# Altium PCB PCB1.PcbDoc (part 1 of 2)
Units mil, origin at the board's own origin, x right, y up, seen from the top; angles counter-clockwise.
Board outline 6000 x 4000 mil, 2 copper layers (Top Layer, Bottom Layer); 89 components, 126 nets, 437 pads, 0 vias.
Unrouted connection lines stored in the file: 287.
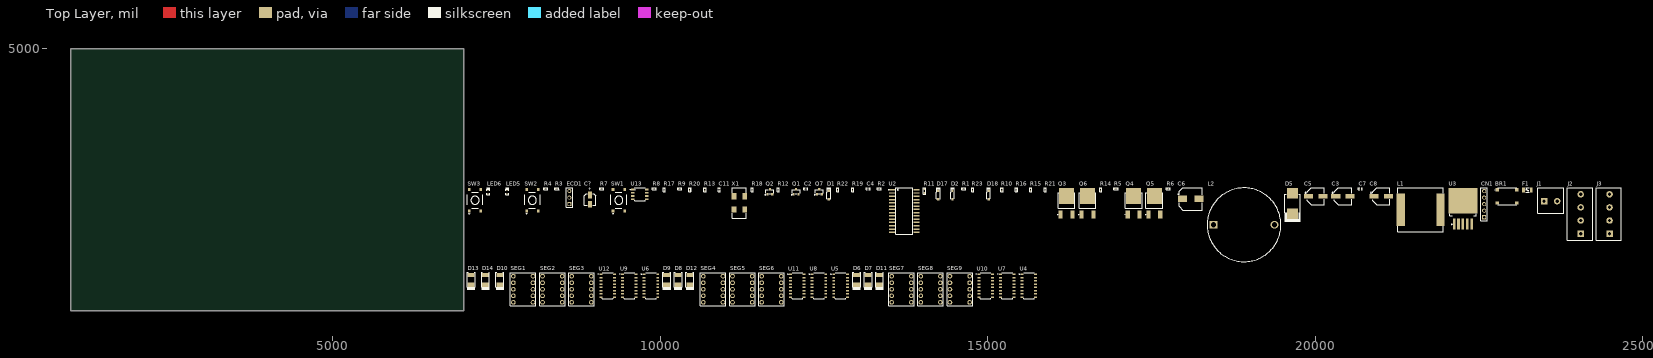
[diagram p0: Top Layer view]
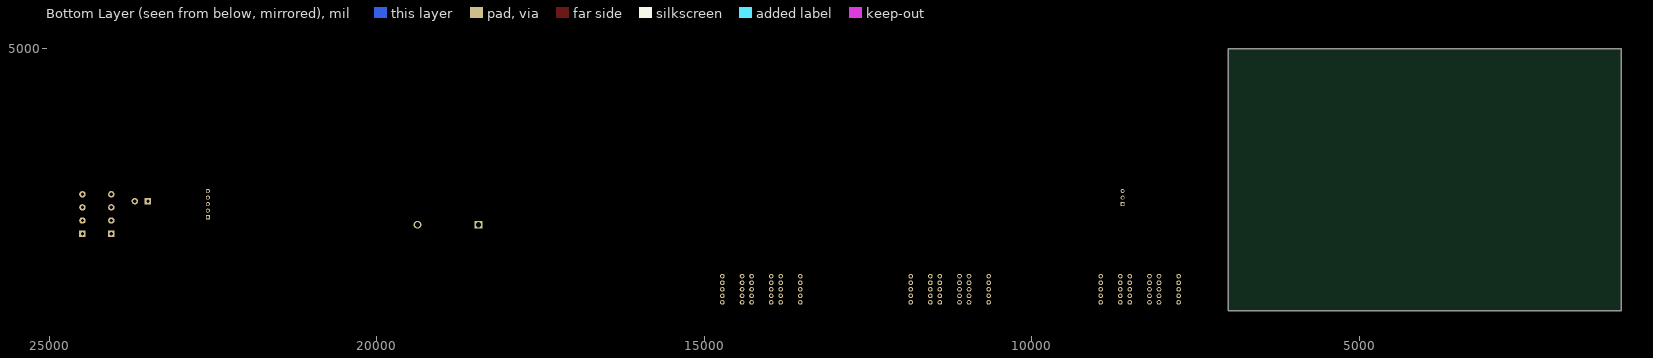
[diagram p1: Bottom Layer view, seen from below]

## Layer stack, top to bottom
Top Solder: solder mask 0.4, Solder Resist, Dk 3.5
Top Layer: signal copper 1.4
Dielectric 1: dielectric 12.6, FR-4, Dk 4.8
Bottom Layer: signal copper 1.4
Bottom Solder: solder mask 0.4, Solder Resist, Dk 3.5

## Board outline
1000,1000 7000,1000 7000,5000 1000,5000

## Design rules (kind name [scope] priority, off if disabled: settings)
Clearance [All] p1: gap=10 ignorepadtopadclearanceinfootprint=FALSE except(0: Arc-Hole Track-Hole SMDPad-Hole THPad-Hole Via-Hole Fill-Hole Poly-Hole Region-Hole Text-Hole)
PolygonConnect [All] p1: connectstyle=Relief reliefconductorwidth=10 reliefentries=4 polygonreliefangle="90 Angle" airgapwidth=10
RoutingVias [All] p1: holewidth=28 width=50 viastyle="Through Hole" minholewidth=28 minwidth=50 maxholewidth=28 maxwidth=50
SolderMaskExpansion [All] p1: expansion=4 istentingtop=FALSE
Width [All] p1: maxlimit=10 minlimit=10 preferedwidth=10
30 further rules are at their usual default settings.

## Classes and differential pairs
component class Controller-Sheet: BR1 C2 C3 C4 C5 C6 C7 C8 C11 C? CN1 D1 D2 D5 D17 D18 ECD1 F1 J1 J2 J3 L1 L2 LED5 LED6 Q1 Q2 Q3 Q4 Q5 Q6 Q7 R1 R2 R3 R4 R5 R6 R7 R8 R9 R10 R11 R12 R13 R14 R15 R16 R17 R18 R19 R20 R21 R22 R23 SW1 SW2 SW3 U2 U3 U13 X1
component class 7-Segment-Sheet: D6 D7 D8 D9 D10 D11 D12 D13 D14 SEG1 SEG2 SEG3 SEG4 SEG5 SEG6 SEG7 SEG8 SEG9 U4 U5 U6 U7 U8 U9 U10 U11 U12

## Components (designator, comment, footprint, x,y, rotation, side; value= is the part's Value field where it differs from the comment)
BR1 "MRS30M" MSBL 22930,2745 r0 top
C2 "0.1uF" Cap-0402 12225,2860 r0 top
C3 "100uF" RVT1H101M0607 20425,2745 r0 top
C4 "0.1uF" Cap-0402 13175,2860 r0 top
C5 "100uF" RVT1H101M0607 20010,2745 r0 top
C6 "100uF" UWT1H101MNL1GS_ 18100,2705 r0 top
C7 "0.1uF" Cap-0402 20690,2860 r0 top
C8 "100uF" RVT1H101M0607 21010,2745 r0 top
C11 "0.1uF" Cap-0402 10905,2845 r90 top
C? "865060640001" WCAP-ASLL_D4H5.5 -41070,52695 r90 top
CN1 "B-2100S05P-A110" HDR1X5_ 22580,2425 r90 top
D1 "BAT43W-TP" SOD-123 12575,2765 r90 top
D2 "BAT43W-TP" SOD-123 14465,2765 r90 top
D5 "B560C-13-F" SMC 19655,2635 r90 top
D6 "1N4007- SMD" SMA(DO-214AC) 13000,1470 r90 top
D7 "1N4007- SMD" SMA(DO-214AC) 13175,1470 r90 top
D8 "1N4007- SMD" SMA(DO-214AC) 10275,1470 r90 top
D9 "1N4007- SMD" SMA(DO-214AC) 10100,1470 r90 top
D10 "1N4007- SMD" SMA(DO-214AC) 7555,1470 r90 top
D11 "1N4007- SMD" SMA(DO-214AC) 13350,1470 r90 top
D12 "1N4007- SMD" SMA(DO-214AC) 10455,1470 r90 top
D13 "1N4007- SMD" SMA(DO-214AC) 7115,1470 r90 top
D14 "1N4007- SMD" SMA(DO-214AC) 7335,1470 r90 top
D17 "BAT43W-TP" SOD-123 14245,2765 r90 top
D18 "BAT43W-TP" SOD-123 15015,2765 r90 top
ECD1 "B-2100S03P-A110" HDR1X3_ 8615,2625 r90 top
F1 "0458005.DR" "Fuse 1206 (3216 Metric)" 23240,2840 r0 top
J1 "1715721" 1715721 23595,2670 r0 top
J2 "1715747" 1715747 24055,2475 r90 top
J3 "1715747" 1715747 24495,2475 r90 top
L1 "100uH" SRP1770TA-101M 21610,2540 r0 top
L2 "1410454C" FP-1410454C-MFG 18915,2310 r0 top
LED5 "RED" LED-0603 7665,2810 r90 top
LED6 "Emerald" LED-0603 7375,2810 r90 top
Q1 "BSS138LT1G" SOT-23 12075,2815 r0 top
Q2 "MMBT3904-TP" SOT-23 11675,2815 r0 top
Q3 "IRFR024NTRPBF" DPAK 16205,2610 r0 top value=75mR
Q4 "IRFR5305TRLPBF" DPAK 17230,2610 r0 top
Q5 "IRFR5305TRLPBF" DPAK 17545,2610 r0 top
Q6 "IRFR024NTRPBF" DPAK 16525,2610 r0 top value=75mR
Q7 "BSS138LT1G" SOT-23 12430,2815 r0 top
R1 "27K" Res-0402 14635,2860 r0 top
R2 "4.7K" Res-0402 13345,2860 r0 top
R3 "1K" Res-0402 8425,2860 r0 top
R4 "1K" Res-0402 8255,2860 r0 top
R5 "12K" Res-0402 16960,2860 r0 top value=12kR
R6 "12K" Res-0402 17760,2860 r0 top value=12kR
R7 "3.3K" Res-0402 9110,2860 r0 top
R8 "33K" Res-0402 9910,2860 r0 top
R9 "3.3K" Res-0402 10300,2860 r0 top
R10 "100K" Res-0402 15220,2845 r90 top
R11 "0.3R" Res-0603 14035,2825 r90 top value=300mR
R12 "12K" Res-0402 11805,2845 r90 top value=12kR
R13 "12K" Res-0402 10685,2845 r90 top value=12kR
R14 "27K" Res-0402 16725,2845 r90 top
R15 "1.5K" Res-0402 15660,2845 r90 top
R16 "100K" Res-0402 15440,2845 r90 top
R17 "1.5K" Res-0402 10065,2845 r90 top
R18 "10K" Res-0402 11405,2845 r90 top
R19 "1.5K" Res-0402 12940,2845 r90 top
R20 "12K" Res-0402 10455,2845 r90 top value=12kR
R21 "1.5K" Res-0402 15880,2845 r90 top
R22 "1.5K" Res-0402 12710,2845 r90 top
R23 "27K" Res-0402 14770,2845 r90 top
SEG1 "SC39-11SURKWA" SC39-11SURKWA 7910,1325 r0 top
SEG2 "SC39-11SURKWA" SC39-11SURKWA 8355,1325 r0 top
SEG3 "SC39-11SURKWA" SC39-11SURKWA 8800,1325 r0 top
SEG4 "SC39-11SURKWA" SC39-11SURKWA 10810,1325 r0 top
SEG5 "SC39-11SURKWA" SC39-11SURKWA 11255,1325 r0 top
SEG6 "SC39-11SURKWA" SC39-11SURKWA 11700,1325 r0 top
SEG7 "SC39-11SURKWA" SC39-11SURKWA 13685,1325 r0 top
SEG8 "SC39-11SURKWA" SC39-11SURKWA 14130,1325 r0 top
SEG9 "SC39-11SURKWA" SC39-11SURKWA 14575,1325 r0 top
SW1 "K2-1102SP-C4SC-04" K2-1102SP-C4SC-04 9370,2685 r90 top
SW2 "K2-1102SP-C4SC-04" K2-1102SP-C4SC-04 8050,2685 r90 top
SW3 "K2-1102SP-C4SC-04" K2-1102SP-C4SC-04 7175,2685 r90 top
U2 "PIC16F873A-I/SO" 28-SOIC 13730,2520 r0 top
U3 "LM2576SX-5.0/NOPB" "TO-263-5 (D2PAK)" 22255,2500 r0 top
U4 "SN74LS595DR" "16-SOIC (0.154\", 3.90mm Width)" 15630,1380 r0 top
U5 "SN74LS595DR" "16-SOIC (0.154\", 3.90mm Width)" 12755,1380 r0 top
U6 "SN74LS595DR" "16-SOIC (0.154\", 3.90mm Width)" 9860,1380 r0 top
U7 "SN74LS595DR" "16-SOIC (0.154\", 3.90mm Width)" 15300,1380 r0 top
U8 "SN74LS595DR" "16-SOIC (0.154\", 3.90mm Width)" 12425,1380 r0 top
U9 "SN74LS595DR" "16-SOIC (0.154\", 3.90mm Width)" 9530,1380 r0 top
U10 "SN74LS595DR" "16-SOIC (0.154\", 3.90mm Width)" 14970,1380 r0 top
U11 "SN74LS595DR" "16-SOIC (0.154\", 3.90mm Width)" 12095,1380 r0 top
U12 "SN74LS595DR" "16-SOIC (0.154\", 3.90mm Width)" 9200,1380 r0 top
U13 "LM358DT" SOP-8 9690,2775 r0 top
X1 "ECS-40-20-18-TR" ECS-40-20-18-TR 11210,2645 r90 top

## Footprints (in the part's own frame and the unit in brackets; to place one, negate y for a bottom-side part, rotate by r counter-clockwise, add the part's x,y. Pads: shape width x height; smd on the part's side, far side on the other; paste and mask are expansions set on the pad)
"16-SOIC (0.154\", 3.90mm Width)" [mm]
  rect 1.12x0.58 smd: 1(-2.64,4.445) 2(-2.64,3.175) 3(-2.64,1.905) 4(-2.64,0.635) 5(-2.64,-0.635) 6(-2.64,-1.905) 7(-2.64,-3.175) 8(-2.64,-4.445) 9(2.64,-4.445) 10(2.64,-3.175) 11(2.64,-1.905) 12(2.64,-0.635) 13(2.64,0.635) 14(2.64,1.905) 15(2.64,3.175) 16(2.64,4.445)
  silkscreen extent -3.74,-5.03 2.06,5.03, body extent -3,-4.95 3,4.95, height 1.75
28-SOIC [mil]
  rect 94.02x22.6 smd paste+0 mask+2: 1(-186.77,325) 2(-186.77,275) 3(-186.77,225) 4(-186.77,175) 5(-186.77,125) 6(-186.77,75) 7(-186.77,25) 8(-186.77,-25) 9(-186.77,-75) 10(-186.77,-125) 11(-186.77,-175) 12(-186.77,-225) 13(-186.77,-275) 14(-186.77,-325) 15(186.77,-325) 16(186.77,-275) 17(186.77,-225) 18(186.77,-175) 19(186.77,-125) 20(186.77,-75) 21(186.77,-25) 22(186.77,25) 23(186.77,75) 24(186.77,125) 25(186.77,175) 26(186.77,225) 27(186.77,275) 28(186.77,325)
  silkscreen extent -243,-355 131,355, body extent -203,-352 203,352, height 104
1715721 [mm]
  rect 2.5x2.5 / inner round 2.5 / far side rect 2.5x2.5 hole 1.3: 1(-2.54,0)
  round 2.5 hole 1.3: 2(2.54,0)
  silkscreen extent -5.08,-4.6 5.08,5.2, body extent -5.64,-4.62 5.09,5.21, height 14.2
1715747 [mm]
  rect 2.5x2.5 / inner round 2.5 / far side rect 2.5x2.5 hole 1.3: 1(-7.62,0)
  round 2.5 hole 1.3: 2(-2.54,0) 3(2.54,0) 4(7.62,0)
  silkscreen extent -10.16,-4.6 10.16,5.2, body extent -10.7,-4.62 10.19,5.21, height 14.2
Cap-0402 [mil]
  rect 18x25 smd mask+2.36: 1(-18.5,0) 2(18.5,0)
  silkscreen extent -31,-16 31,16, body extent -20,-10 20,10, height 19
DPAK [mm]
  rect 1.6x3 smd: 1(-2.285,-3.59) 3(2.285,-3.59)
  rect 5.8x6.2 smd: 2(0,3.59)
  silkscreen extent -3.35,-3.76 3.28,4.88, body extent -3.28,-3.99 3.22,5.92, height 2.51
ECS-40-20-18-TR [mm]
  rect 2.4x1.9 smd: 1(-2.54,-2.1) 1(-2.54,2.1) 2(2.54,-2.1) 2(2.54,2.1)
  silkscreen extent -5.9,-2.75 5.9,2.75
FP-1410454C-MFG [mm]
  rect 3.05x3.05 hole 2 paste-1000 mask+0: 1(-11.8,0)
  round 3.05 hole 2 paste-1000 mask+0: 2(11.8,0)
  silkscreen extent -14.3,-14.3 14.3,14.3, body extent -14.05,-14.05 14.05,14.05, height 0.25
"Fuse 1206 (3216 Metric)" [mm] "0.126\" L x 0.062\" W x 0.026\" H (3.20mm x 1.58mm x 0.65mm)"
  rect 1.06x1.82 smd: 1(-1.528,0) 2(1.528,0)
  silkscreen extent -0.68,-0.85 0.68,0.85, body extent -1.6,-0.79 1.6,0.79, height 0.85
HDR1X3_ [mm] "Connector; Header; 3 Position"
  rect 1.5x1.5 hole 0.9: 1(0,0)
  round 1.5 hole 0.9: 2(2.54,0) 3(5.08,0)
  silkscreen extent -1.27,-1.27 6.35,1.27, body extent -1.27,-1.24 6.35,1.25, height 8.54
HDR1X5_ [mm] "Connector; Header; 5 Position"
  rect 1.6x1.6 hole 0.95: 1(0,0)
  round 1.6 hole 0.95: 2(2.54,0) 3(5.08,0) 4(7.62,0) 5(10.16,0)
  silkscreen extent -1.27,-1.27 11.43,1.27, body extent -1.27,-1.27 11.43,1.23, height 8.65
K2-1102SP-C4SC-04 [mm]
  rect 1.15x1 smd: 1(-4.175,2.25) 2(4.175,2.25) 3(-4.175,-2.25) 4(4.175,-2.25)
  silkscreen extent -5.16,-3.05 3.15,3.05, body extent -4.75,-3 4.75,3, height 5.07
LED-0603 [mm]
  rect 0.5x1 smd: 1(-0.75,0) 2(0.75,0)
  silkscreen extent -1.12,-0.66 1.75,0.66, body extent -0.82,-0.37 0.82,0.36, height 0.68
MSBL [mm]
  rect 1.3x1.2 smd paste+0 mask+0.051: 1(-3.75,2.55) 2(3.75,2.55) 3(-3.75,-2.55) 4(3.75,-2.55)
  silkscreen extent -4.78,-3.35 3.7,3.35
Res-0402 [mil]
  rect 18x25 smd mask+2.17: 1(-18.5,0) 2(18.5,0)
  silkscreen extent -32,-17 32,16, body extent -23,-11 23,11, height 16
Res-0603 [mil]
  rect 30x35 smd: 1(-30,0) 2(30,0)
  silkscreen extent -48,-21 48,21, body extent -31,-17 31,17, height 18
RVT1H101M0607 [mm]
  rect 3.5x1.6 smd: 1(-2.8,0) 2(2.8,0)
  silkscreen extent -4.27,-3.33 3.32,3.33, body extent -3.31,-3.33 3.29,3.27, height 7.94
SC39-11SURKWA [mm]
  round 1.8 hole 1: 1(-3.81,5.08) 2(-3.81,2.54) 3(-3.81,0) 4(-3.81,-2.54) 5(-3.81,-5.08) 6(3.81,-5.08) 7(3.81,-2.54) 8(3.81,0) 9(3.81,2.54) 10(3.81,5.08)
  silkscreen extent -4.95,-6.48 4.95,6.48
SMA(DO-214AC) [mm]
  rect 1.6x2.8 smd: 1(-1.9,0) 2(1.9,0)
  silkscreen extent -3.99,-1.6 2.84,1.6, body extent -2.6,-1.45 2.6,1.45, height 2.3
SMC [mm]
  rect 4.1x4.3 smd: 1(-3.95,0) 2(3.95,0)
  silkscreen extent -7.24,-3.05 3.58,3.05, body extent -3.9,-2.95 3.9,2.95, height 2.41
SOD-123 [mm]
  rect 0.95x0.9 smd: 1(-1.575,0) 2(1.575,0)
  silkscreen extent -1.37,-0.8 2.82,0.8, body extent -1.82,-0.78 1.83,0.78, height 1.5
SOP-8 [mm]
  rect 1.3x0.7 smd: 1(-2.75,1.905) 2(-2.75,0.635) 3(-2.75,-0.635) 4(-2.75,-1.905) 5(2.75,-1.905) 6(2.75,-0.635) 7(2.75,0.635) 8(2.75,1.905)
  silkscreen extent -3.69,-2.57 2.03,2.57, body extent -3.1,-2.5 3.1,2.5, height 1.76
SOT-23 [mm] "TRANS NPN 40V 0.6A SOT23"
  rect 0.82x0.92 smd: 1(-0.95,-1) 2(0.95,-1) 3(0,1)
  silkscreen extent -1.68,-1.3 1.55,0.81, body extent -1.5,-1.25 1.5,1.25, height 1.05
SRP1770TA-101M [mm]
  rect 3.15x12.5 smd paste+0 mask+0.051: 1(-7.7,0) 2(7.7,0)
  silkscreen extent -8.84,-8.51 8.84,8.51, body extent -8.8,-8.45 8.8,8.46, height 6.7
"TO-263-5 (D2PAK)" [mm]
  rect 1.02x4.32 smd: 1(-3.4,-4.573) 2(-1.7,-4.573) 3(0,-4.573) 4(1.7,-4.573) 5(3.4,-4.573)
  rect 11.18x9.91 smd: 6(0,4.573)
  silkscreen extent -5.16,-4.72 5.16,-0.61, body extent -5.11,-5.78 5.05,9.13, height 4.83
UWT1H101MNL1GS_ [mm]
  rect 3.5x2.5 smd: 1(-3.25,0) 2(3.25,0)
  silkscreen extent -5.1,-4.32 4.45,4.32, body extent -4.65,-4.25 4.65,4.25, height 10.34
WCAP-ASLL_D4H5.5 [mm] "Aluminium Electrolytic V-Chip SMT Capacitors, 4x5.5mm"
  rect 2.6x1.6 smd: 1(-1268.2,-1270) 2(-1271.8,-1270)
  silkscreen extent -1272.25,-1272.25 -1267.75,-1267.75, body extent -1272.5,-1272.15 -1267.5,-1267.85, height 5.5

## Part data
BR1: "RAPID GPP RECTIFIER MSB T&R 2.5K", Manufacturer=Diodes, Supplier Part Number=31-MRS30MCT-ND, Item Type="Bridge Rectifiers", Manufacturer Part Number=MRS30M, Pricing="1=0.46, 10=0.357, 100=0.2143, 500=0.19846, 1000=0.13496 (USD)", RoHS=No, Stock=4995, Supplier=Digikey
C2 C4 C7 C11: library part C1005X5R1H104K050BB, "CAP CER 0.1UF 50V X5R 0402", Capacitance=100nF, Case Code (Imperial)=0402, Case Code (Metric)=1005, Dielectric=X5R, Dielectric Material=Ceramic, LCSC Part Number=C2181865, Manufacturer=TDK, Max Operating Temperature=85°C, Min Operating Temperature=-55°C, Package Quantity=1, Supplier Part Number 1=445-5942-1-ND, Tolerance=10%, Voltage=50V, Case/Package=0402, ComponentLink1Description=https://product.tdk.com/info/en/catalog/spec/mlccspec_commercial_general_midvoltage_en.pdf?src-supplier=Digi-Key, ComponentLink1URL=https://product.tdk.com/info/en/catalog/spec/mlccspec_commercial_general_midvoltage_en.pdf?src-supplier=Digi-Key, ComponentLink2Description=http://www.tdk.co.jp/tefe02/e413_c.pdf?src-supplier=Future+Electronics, ComponentLink2URL=http://www.tdk.co.jp/tefe02/e413_c.pdf?src-supplier=Future+Electronics, ComponentLink3Description=https://www.verical.com/server-webapp/html/getDatasheet?partID=743571&src-supplier=Verical, ComponentLink3URL=https://www.verical.com/server-webapp/html/getDatasheet?partID=743571&src-supplier=Verical, ComponentLink4Description=http://www.tdk.co.jp/tefe02/e412_c.pdf?src-supplier=Avnet+Europe, ComponentLink4URL=http://www.tdk.co.jp/tefe02/e412_c.pdf?src-supplier=Avnet+Europe, Construction=Flat, Depth=0.5mm, Height=0.5mm, Item Type=Capacitor, Lead Free="Lead Free", Length=1mm, Manufacturer Part Number=C1005X5R1H104K050BB, Mount="Surface Mount", Packaging="Tape and Reel", Pricing 1="1=0.12, 10=0.09, 50=0.049, 100=0.04, 500=0.02858, 1000=0.02245, 2500=0.02041, 5000=0.01878 (USD)", Radiation Hardening=No, REACH SVHC="No SVHC", Resistor Type=Ceramic, RoHS Compliant=Yes, Series=C, Stock 1=1455182, Supplier 1=Digi-Key, Termination=SMD/SMT, Thickness=0.022inch, Voltage Rating=50V, Voltage Rating (DC)=50V, Weight=2.3E-05oz, Width=0.02inch
C3 C5 C8: library part RVT1H101M0607, "100uF 50V ±20% SMD,D6.3xL7.7mm Aluminum Electrolytic Capacitors - SMD ROHS", LCSC Part Number=C3151829, Manufacturer=ROQANG, Package=SMD,D6.3xL7.7mm, ComponentLink1Description=LCSC, ComponentLink1URL=https://www.lcsc.com/product-detail/Aluminum-Electrolytic-Capacitors-SMD_ROQANG-RVT1H101M0607_C3151829.html, Item Type=Capacitor, Manufacturer Part Number=RVT1H101M0607
C6: library part UWT1H101MNL1GS, "CAP ALUM 100UF 20% 50V SMD", Case/Package=Radial, Dielectric Material=Aluminium, LCSC Part Number=C445063, Leakage Current=3uA, Manufacturer=Nichicon, Max Operating Temperature=105°C, Min Operating Temperature=-55°C, Package Quantity=500, Ripple Current=140mA, Supplier Part Number 1=493-2226-1-ND, Tolerance=20%, Voltage=50V, Capacitance=100uF, ComponentLink1Description=http://www.farnell.com/datasheets/2100058.pdf?src-supplier=Element14, ComponentLink1URL=http://www.farnell.com/datasheets/2100058.pdf?src-supplier=Element14, ComponentLink2Description=http://www.farnell.com/datasheets/2576809.pdf?src-supplier=Element14, ComponentLink2URL=http://www.farnell.com/datasheets/2576809.pdf?src-supplier=Element14, ComponentLink3Description=http://www.nichicon.co.jp/english/products/pdfs/e-ch_ref.pdf?src-supplier=Digi-Key, ComponentLink3URL=http://www.nichicon.co.jp/english/products/pdfs/e-ch_ref.pdf?src-supplier=Digi-Key, ComponentLink4Description=http://www.mouser.com/ds/2/293/e-wt-30307.pdf?src-supplier=Mouser, ComponentLink4URL=http://www.mouser.com/ds/2/293/e-wt-30307.pdf?src-supplier=Mouser, ComponentLink5Description=http://uk.rs-online.com/webdocs/13ec/0900766b813ecfdc.pdf?src-supplier=RSComponents, ComponentLink5URL=http://uk.rs-online.com/webdocs/13ec/0900766b813ecfdc.pdf?src-supplier=RSComponents, ComponentLink6Description=http://www.nichicon.co.jp/english/products/pdfs/e-wt.pdf?src-supplier=Avnet, ComponentLink6URL=http://www.nichicon.co.jp/english/products/pdfs/e-wt.pdf?src-supplier=Avnet, ComponentLink7Description=http://products.nichicon.co.jp/en/pdf/XJA043/e-wt.pdf?src-supplier=Future+Electronics, ComponentLink7URL=http://products.nichicon.co.jp/en/pdf/XJA043/e-wt.pdf?src-supplier=Future+Electronics, ComponentLink8Description=http://www.nichicon.co.jp/english/products/pdfs/e-wt.pdf?src-supplier=Avnet+Europe, ComponentLink8URL=http://www.nichicon.co.jp/english/products/pdfs/e-wt.pdf?src-supplier=Avnet+Europe, Construction=Cylindrical, Diameter=8mm, Dissipation Factor=0.14%, Height=10mm, Height - Seated (Max)=0.413inch, Item Type=Capacitor, Lead Free="Lead Free", Length=10mm, Life (Hours)=1000Hour, Manufacturer Part Number=UWT1H101MNL1GS, Mount="Surface Mount", Number of Pins=2, Packaging="Tape and Reel", Pricing 1="1=0.57, 10=0.405, 50=0.3058, 100=0.2664 (USD)", Radiation Hardening=No, REACH SVHC="No SVHC", Ripple Current (AC)=140mA, RoHS Compliant=Yes, Series=WT, Stock 1=24169, Supplier 1=Digi-Key, Termination=SMD/SMT, Voltage Rating=50V, Voltage Rating (DC)=50V
C?: library part CMP-03913-53914524-1, "865060640001 WCAP-ASLL Aluminum Electrolytic Capacitors", Capacitance=1µF, Case/Package=Radial, Insulation Resistance=16.6667MΩ, Leakage Current=3µA, Max Operating Temperature=105°C, Min Operating Temperature=-55°C, Ripple Current=60mA, Tolerance=20%, Voltage Rating=50V, Diameter=4mm, Height=5.5mm, Height - Seated (Max)=5.5118mm, Impedance=4.4Ω, Length=5.5mm, Life (Hours)=2000hours, Mount="Surface Mount", NexarPartId=53914524, Packaging="Tape & Reel (TR)", Polarity=Polar, REACH SVHC=Unknown, Ripple Current (AC)=60mA, RoHS=Compliant, Voltage Rating (DC)=50V
CN1: "Straight 2.54mm 6mm -40℃~+105℃ 3mm 5 2.54mm Plugin Black Brass 1x5P Plugin,P=2.54mm Pin Headers ROHS", LCSC Part Number=C124379, Manufacturer="Ckmtw(Shenzhen Cankemeng)", Package=Plugin,P=2.54mm, ComponentLink1Description=LCSC, ComponentLink1URL=https://www.lcsc.com/product-detail/Pin-Headers_Ckmtw-Shenzhen-Cankemeng-B-2100S05P-A110_C124379.html, Item Type=Header, Manufacturer Part Number=B-2100S05P-A110
D1 D2 D17 D18: "DIODE SCHOTTKY 30V 200MA SOD123", LCSC Part Number=C914267, Manufacturer="Micro Commercial Co", Package=SOD-123, ComponentLink1Description=LCSC, ComponentLink1URL=https://www.lcsc.com/product-detail/Schottky-Barrier-Diodes-SBD_MCC-Micro-Commercial-Components-BAT43W-TP_C914267.html, Item Type=Diode, Manufacturer Part Number=BAT43W-TP
D5: "DIODE SCHOTTKY 60V 5A SMC", LCSC Part Number=C85100, Manufacturer=Diodes, ComponentLink1Description=https://datasheet.ciiva.com/27052/1538961-27052355.pdf?src-supplier=Jameco, ComponentLink1URL=https://datasheet.ciiva.com/27052/1538961-27052355.pdf?src-supplier=Jameco, ComponentLink2Description=https://datasheet.ciiva.com/16389/ds13012-16389735.pdf?src-supplier=Future+Electronics, ComponentLink2URL=https://datasheet.ciiva.com/16389/ds13012-16389735.pdf?src-supplier=Future+Electronics, ComponentLink3Description=https://datasheet.ciiva.com/15144/getdatasheetpartid-89786-15144652.pdf?src-supplier=Verical, ComponentLink3URL=https://datasheet.ciiva.com/15144/getdatasheetpartid-89786-15144652.pdf?src-supplier=Verical, ComponentLink4Description=https://datasheet.ciiva.com/1177/ds13012-1177532.pdf?src-supplier=Element14, ComponentLink4URL=https://datasheet.ciiva.com/1177/ds13012-1177532.pdf?src-supplier=Element14, ComponentLink5Description=https://datasheet.ciiva.com/914/ds13012-914985.pdf?src-supplier=Digikey, ComponentLink5URL=https://datasheet.ciiva.com/914/ds13012-914985.pdf?src-supplier=Digikey, ComponentLink6Description=https://datasheet.ciiva.com/914/ds13012-914986.pdf?src-supplier=Digikey, ComponentLink6URL=https://datasheet.ciiva.com/914/ds13012-914986.pdf?src-supplier=Digikey, ComponentLink7Description=https://datasheet.ciiva.com/914/ds13012-914987.pdf?src-supplier=Digikey, ComponentLink7URL=https://datasheet.ciiva.com/914/ds13012-914987.pdf?src-supplier=Digikey, Item Type="Rectifier Diodes", Manufacturer Part Number=B560C-13-F, Pricing="3000=0.151, 6000=0.148, 9000=0.146, 12000=0.145, 15000=0.141 (USD)", RoHS=Yes, Stock=846000, Supplier="Future Electronics"
D6 D7 D8 D9 D10 D11 D12 D13 D14: "1A Single 1kV 1.1V@1A SMA(DO-214AC) Diodes - General Purpose ROHS", LCSC Part Number=C727081, Manufacturer=TWGMC, Manufacturer Part Number=1N4007, Package=SMA(DO-214AC), ComponentLink1Description=LCSC, ComponentLink1URL=https://www.lcsc.com/product-detail/Diodes-General-Purpose_TWGMC-1N4007_C727081.html, Item Type=Diode
ECD1: "Straight 2.54mm Black Brass 1x3P Plugin,P=2.54mm Pin Headers ROHS", LCSC Part Number=C124376, Manufacturer=Ckmtw, ComponentLink1Description=LCSC, ComponentLink1URL=https://www.lcsc.com/product-detail/Pin-Headers_Ckmtw-Shenzhen-Cankemeng-B-2100S03P-A110_C124376.html, Item Type=Header, Manufacturer Part Number=B-2100S03P-A110
F1: "FUSE BRD MNT 5A 32VAC 75VDC 1206", LCSC Part Number=C187561, Manufacturer=Littelfuse, Supplier Part Number=1740294, Category=Fuses, ComponentLink1Description=https://datasheet.ciiva.com/1730/337915-1730547.pdf?src-supplier=Newark, ComponentLink1URL=https://datasheet.ciiva.com/1730/337915-1730547.pdf?src-supplier=Newark, ComponentLink2Description=https://datasheet.ciiva.com/7991/337915-7991910.pdf?src-supplier=Element14, ComponentLink2URL=https://datasheet.ciiva.com/7991/337915-7991910.pdf?src-supplier=Element14, ComponentLink3Description=https://datasheet.ciiva.com/299/littelfuse-fuse-458-series-299786.pdf?src-supplier=Digikey, ComponentLink3URL=https://datasheet.ciiva.com/299/littelfuse-fuse-458-series-299786.pdf?src-supplier=Digikey, ComponentLink4Description=https://datasheet.ciiva.com/299/littelfuse-fuse-458-series-299787.pdf?src-supplier=Digikey, ComponentLink4URL=https://datasheet.ciiva.com/299/littelfuse-fuse-458-series-299787.pdf?src-supplier=Digikey, ComponentLink5Description=https://datasheet.ciiva.com/299/littelfuse-fuse-458-series-299788.pdf?src-supplier=Digikey, ComponentLink5URL=https://datasheet.ciiva.com/299/littelfuse-fuse-458-series-299788.pdf?src-supplier=Digikey, Item Type=Fuse, Manufacturer Part Number=0458005.DR, Pricing="1=0.6241, 10=0.73892, 25=0.71895, 50=0.70003 (GBP)", RoHS=Yes, Stock=1005, Supplier=Rs
J1: "TERM BLK 2P SIDE ENT 5.08MM PCB", Manufacturer="Phoenix Contact", Supplier Part Number=277-1263-ND, ComponentLink1Description=https://datasheet.ciiva.com/1120/1697161-1120393.pdf?src-supplier=Farnell, ComponentLink1URL=https://datasheet.ciiva.com/1120/1697161-1120393.pdf?src-supplier=Farnell, ComponentLink2Description=https://datasheet.ciiva.com/832/1715721-832095.pdf?src-supplier=Digikey, ComponentLink2URL=https://datasheet.ciiva.com/832/1715721-832095.pdf?src-supplier=Digikey, ComponentLink3Description=https://datasheet.ciiva.com/15169/getdatasheetpartid-212174-15169929.pdf?src-supplier=Verical, ComponentLink3URL=https://datasheet.ciiva.com/15169/getdatasheetpartid-212174-15169929.pdf?src-supplier=Verical, ComponentLink4Description=https://datasheet.ciiva.com/16046/1715721-16046034.pdf?src-supplier=Onlinecomponents.com, ComponentLink4URL=https://datasheet.ciiva.com/16046/1715721-16046034.pdf?src-supplier=Onlinecomponents.com, Item Type="Terminal Blocks", Manufacturer Part Number=1715721, Pricing="1=0.94 (USD)", RoHS=Yes, Stock=13160, Supplier=Digikey
J2 J3: "TERM BLK 4P SIDE ENT 5.08MM PCB", Manufacturer="Phoenix Contact", Supplier Part Number=277-1265-ND, ComponentLink1Description=https://datasheet.ciiva.com/16071/1715747-16071928.pdf?src-supplier=Onlinecomponents.com, ComponentLink1URL=https://datasheet.ciiva.com/16071/1715747-16071928.pdf?src-supplier=Onlinecomponents.com, ComponentLink2Description=https://datasheet.ciiva.com/23596/100425-23596240.pdf?src-supplier=Newark, ComponentLink2URL=https://datasheet.ciiva.com/23596/100425-23596240.pdf?src-supplier=Newark, ComponentLink3Description=https://datasheet.ciiva.com/15169/getdatasheetpartid-227081-15169962.pdf?src-supplier=Verical, ComponentLink3URL=https://datasheet.ciiva.com/15169/getdatasheetpartid-227081-15169962.pdf?src-supplier=Verical, ComponentLink4Description=https://datasheet.ciiva.com/11757/0900766b811d7317-11757713.pdf?src-supplier=Rs, ComponentLink4URL=https://datasheet.ciiva.com/11757/0900766b811d7317-11757713.pdf?src-supplier=Rs, ComponentLink5Description=https://datasheet.ciiva.com/824/1715747-824336.pdf?src-supplier=Digikey, ComponentLink5URL=https://datasheet.ciiva.com/824/1715747-824336.pdf?src-supplier=Digikey, ComponentLink6Description=https://datasheet.ciiva.com/1120/1731555-1120440.pdf?src-supplier=Farnell, ComponentLink6URL=https://datasheet.ciiva.com/1120/1731555-1120440.pdf?src-supplier=Farnell, ComponentLink7Description=https://datasheet.ciiva.com/1118/1731555-1118428.pdf?src-supplier=Element14, ComponentLink7URL=https://datasheet.ciiva.com/1118/1731555-1118428.pdf?src-supplier=Element14, ComponentLink8Description=https://datasheet.ciiva.com/33106/1715747-33106010.pdf?src-supplier=Today+Components, ComponentLink8URL=https://datasheet.ciiva.com/33106/1715747-33106010.pdf?src-supplier=Today+Components, ComponentLink9Description=https://datasheet.ciiva.com/29218/743477-da-01-en-printklemmenblock-mkds-1-5-4-5-08-29218070.pdf?src-supplier=Conrad, ComponentLink9URL=https://datasheet.ciiva.com/29218/743477-da-01-en-printklemmenblock-mkds-1-5-4-5-08-29218070.pdf?src-supplier=Conrad, Item Type="Terminal Blocks", Manufacturer Part Number=1715747, Pricing="1=2.39, 10=2.287, 50=2.188, 100=2.1282, 250=1.989, 500=1.82988, 1000=1.79562 (USD)", RoHS=Yes, Stock=3401, Supplier=Digikey
L1: library part SRP1770TA-101M, "FIXED IND 100UH 5.3A 118MOHM SMD", LCSC Part Number=-, Manufacturer="Bourns Inc.", Package=Custom, ComponentLink1Description=LCSC, Item Type=Inductor, Manufacturer Part Number=SRP1770TA-101M
L2: library part CMP-20514-000002-1, "FIXED IND 100UH 5.4A 46 MOHM TH", Case/Package=Radial, Current Rating=5.4A, DC Resistance (DCR)=46mR, Inductance=100uH, Inductance Tolerance=10%, Max Operating Temperature=85°C, Min Operating Temperature=-40°C, Package Quantity=25, Resistor Type=Wirewound, Self Resonant Frequency=4.6MHz, Test Frequency=100kHz, DC Current=5.4A, Depth=25.9mm, Height=1.5mm, Height - Seated (Max)=0.61inch, Lead Free="Lead Free", Lead Length=10mm, Lead Pitch=23.6mm, Lead/Base Style=Radial, Length=14mm, Max DC Current=5.4A, Military Standard=Not, Mount="Through Hole", Number of Pins=2, Orientation=Vertical, Packaging=Tray, Q Factor=24, Radiation Hardening=No, Rated Current-Max=5.4A, REACH SVHC="No SVHC", RMS Current (Irms)=5.4A, RoHS Compliant=Yes, Saturation Current=5.4A, Series=1400, Shielding=Unshielded, Termination=Radial, Tolerance=10%, Type="General Purpose"
LED5: library part NCD0603R3, "RED LED 0603 Light Emitting Diodes", LCSC Part Number=C3151730, Manufacturer="Foshan NationStar Optoelectronics", Package=0603, ComponentLink1Description=LCSC, ComponentLink1URL=https://www.lcsc.com/product-detail/Light-Emitting-Diodes-LED_Foshan-NationStar-Optoelectronics-NCD0603R3_C3151730.html, Item Type=LED, Manufacturer Part Number=NCD0603R3
LED6: library part NCD0603G2, "Emerald 0603 Light Emitting Diodes (LED) ROHS", LCSC Part Number=C87326, Manufacturer="Foshan NationStar Optoelectronics", Package=0603, ComponentLink1Description=LCSC, ComponentLink1URL=https://www.lcsc.com/product-detail/Light-Emitting-Diodes-LED_Foshan-NationStar-Optoelectronics-NCD0603G2_C87326.html, Item Type=LED, Manufacturer Part Number=NCD0603G2
Q1 Q7: "MOSFET N-CH 50V 200MA SOT-23", Case/Package=SOT-23-3, Continuous Drain Current (ID)=200mA, Drain to Source Breakdown Voltage=50V, Drain to Source Resistance=3.5R, Gate to Source Voltage (Vgs)=20V, Input Capacitance=50pF, LCSC Part Number=C82045, Manufacturer="ON Semiconductor", Max Operating Temperature=150°C, Max Power Dissipation=225mW, Min Operating Temperature=-55°C, Package Quantity=1, Supplier Part Number 1=BSS138LT1GOSDKR-ND, Threshold Voltage=1.5V, ComponentLink1Description=https://datasheet.ciiva.com/22641/1596366-22641636.pdf, ComponentLink1URL=https://datasheet.ciiva.com/22641/1596366-22641636.pdf, ComponentLink2Description=https://datasheet.ciiva.com/1190/1596366-1190137.pdf, ComponentLink2URL=https://datasheet.ciiva.com/1190/1596366-1190137.pdf, ComponentLink3Description=https://datasheet.ciiva.com/15198/getdatasheetpartid-110266-15198908.pdf, ComponentLink3URL=https://datasheet.ciiva.com/15198/getdatasheetpartid-110266-15198908.pdf, ComponentLink4Description=https://datasheet.ciiva.com/8115/bss138lt1-d-8115295.pdf, ComponentLink4URL=https://datasheet.ciiva.com/8115/bss138lt1-d-8115295.pdf, ComponentLink5Description=https://datasheet.ciiva.com/8115/bss138lt1-d-8115358.pdf, ComponentLink5URL=https://datasheet.ciiva.com/8115/bss138lt1-d-8115358.pdf, ComponentLink6Description=https://datasheet.ciiva.com/1190/1596366-1190136.pdf, ComponentLink6URL=https://datasheet.ciiva.com/1190/1596366-1190136.pdf, ComponentLink7Description=https://datasheet.ciiva.com/936/bss138lt1-d-936802.pdf, ComponentLink7URL=https://datasheet.ciiva.com/936/bss138lt1-d-936802.pdf, ComponentLink8Description=https://datasheet.ciiva.com/936/bss138lt1-d-936801.pdf, ComponentLink8URL=https://datasheet.ciiva.com/936/bss138lt1-d-936801.pdf, ComponentLink9Description=https://datasheet.ciiva.com/14553/70099493-14553829.pdf, ComponentLink9URL=https://datasheet.ciiva.com/14553/70099493-14553829.pdf, ComponentLink10Description=https://datasheet.ciiva.com/936/bss138lt1-d-936803.pdf, ComponentLink10URL=https://datasheet.ciiva.com/936/bss138lt1-d-936803.pdf, ComponentLink11Description=http://www.onsemi.com/pub/Collateral/BSS138LT1-D.PDF?src-supplier=Digi-Key, ComponentLink11URL=http://www.onsemi.com/pub/Collateral/BSS138LT1-D.PDF?src-supplier=Digi-Key, ComponentLink12Description=http://www.farnell.com/datasheets/1596366.pdf?src-supplier=Element14, ComponentLink12URL=http://www.farnell.com/datasheets/1596366.pdf?src-supplier=Element14, ComponentLink13Description=http://www.alliedelec.com/m/d/b3c6fd7d92596813fe75d33dcbaaae90.pdf?src-supplier=Allied+Electronics, ComponentLink13URL=http://www.alliedelec.com/m/d/b3c6fd7d92596813fe75d33dcbaaae90.pdf?src-supplier=Allied+Electronics, ComponentLink14Description=https://www.verical.com/server-webapp/html/getDatasheet?partID=110266&src-supplier=Verical, ComponentLink14URL=https://www.verical.com/server-webapp/html/getDatasheet?partID=110266&src-supplier=Verical, ComponentLink15Description=http://www.onsemi.com/pub_link/Collateral/BSS138LT1-D.PDF?src-supplier=Avnet, ComponentLink15URL=http://www.onsemi.com/pub_link/Collateral/BSS138LT1-D.PDF?src-supplier=Avnet, Contact Plating=Tin,Matte, Current Rating=200mA, Element Configuration=Single, Halogen Free="Halogen Free", Height=1.01mm, Item Type=Mosfet, Lead Free="Lead Free", Length=3.04mm, Manufacturer Part Number=BSS138LT1G, Nominal Vgs=1.5V, Number of Elements=1, Number of Pins=3, On-State Resistance=3.5R, Packaging="Tape and Reel", Power Dissipation=225mW, Pricing 1="1=0.27, 10=0.222, 100=0.1177, 500=0.07746, 1000=0.05267 (USD)", Radiation Hardening=No, Rds On Max=3.5R, REACH SVHC="No SVHC", Stock 1=1283212, Supplier 1=Digi-Key, Turn-Off Delay Time=20ns, Turn-On Delay Time=20ns, Voltage Rating (DC)=50V, Width=1.4mm
Q2: "TRANS NPN 40V 0.2A SOT23", Case/Package=SOT-23, Clock Frequency=300MHz, Collector Base Voltage (VCBO)=60V, Collector Emitter Breakdown Voltage=40V, Collector Emitter Saturation Voltage=300mV, Current Rating=100mA, Emitter Base Voltage (VEBO)=6V, Manufacturer=MCC, Max Collector Current=200mA, Max Operating Temperature=150°C, Max Power Dissipation=350mW, Min Operating Temperature=-55°C, Package Quantity=1, Supplier Part Number=MMBT3904TPMSCT-ND, Collector Emitter Voltage (VCEO)=40V, Collector-emitter Voltage-Max=300mV, ComponentLink1Description=https://datasheet.ciiva.com/16291/mmbt3904sot-23-37005-16291911.pdf?src-supplier=Mouser, ComponentLink1URL=https://datasheet.ciiva.com/16291/mmbt3904sot-23-37005-16291911.pdf?src-supplier=Mouser, ComponentLink2Description=https://datasheet.ciiva.com/15139/getdatasheetpartid-251950-15139820.pdf?src-supplier=Verical, ComponentLink2URL=https://datasheet.ciiva.com/15139/getdatasheetpartid-251950-15139820.pdf?src-supplier=Verical, ComponentLink3Description=https://datasheet.ciiva.com/972/mmbt3904sot-23-972515.pdf?src-supplier=Digikey, ComponentLink3URL=https://datasheet.ciiva.com/972/mmbt3904sot-23-972515.pdf?src-supplier=Digikey, ComponentLink4Description=https://datasheet.ciiva.com/14546/70055699-14546053.pdf?src-supplier=Allied+Electronics, ComponentLink4URL=https://datasheet.ciiva.com/14546/70055699-14546053.pdf?src-supplier=Allied+Electronics, ComponentLink5Description=https://datasheet.ciiva.com/16742/mmbt3904tsot-523-16742101.pdf?src-supplier=Future+Electronics, ComponentLink5URL=https://datasheet.ciiva.com/16742/mmbt3904tsot-523-16742101.pdf?src-supplier=Future+Electronics, ComponentLink6Description=https://datasheet.ciiva.com/972/mmbt3904sot-23-972516.pdf?src-supplier=Digikey, ComponentLink6URL=https://datasheet.ciiva.com/972/mmbt3904sot-23-972516.pdf?src-supplier=Digikey, Frequency=300MHz, Gain Bandwidth Product=300MHz, Height=1.12mm, hFE Min=40, Item Type=BJTs, Lead Free=5697LeadFree, Length=3.04mm, Manufacturer Part Number=MMBT3904-TP, Max Breakdown Voltage=40V, Mounting Technology="Surface Mount", Number of Elements=1, Packaging="Tape and Reel", Pins=3, Polarity=NPN, Power Dissipation=350mW, Pricing="1=0.1, 10=0.068, 100=0.0369, 500=0.02898, 1000=0.02012 (USD)", Radiation Hardening=No, RoHS=Yes, RoHS Compliant=Yes, Series=-, Stock=2179653, Supplier=Digikey, Transition Frequency=300MHz, Voltage Rating (DC)=40V, Width=1.4mm
Q3 Q6: "MOSFET N-CH 55V 17A DPAK", Current Rating=17A, Manufacturer=Infineon, On-State Resistance=75mR, Package Quantity=2000NUMBER, Supplier Part Number=942-IRFR024NTRPBF, Voltage Rating (DC)=55V, Element Configuration=5460ElementConfiguration, Fall Time=27ns, Item Type=MOSFET, Manufacturer Part Number=IRFR024NTRPBF, Nominal Vgs=4V, Number of Elements=1NUMBER, Pricing="1=0.62, 10=0.541, 50=0.541, 100=0.375, 1000=0.294, 10000=0.293 (USD)", Radiation Hardening=5898YesNo, RoHS=Yes, Stock=51400, Supplier=Mouser
Q4 Q5: "MOSFET P-CH 55V 31A DPAK", Case/Package=TO-252-3, Continuous Drain Current (ID)=31A, Drain to Source Breakdown Voltage=-55V, Drain to Source Resistance=65mR, Gate to Source Voltage (Vgs)=20V, Input Capacitance=1.2nF, Manufacturer=Infineon, Max Operating Temperature=175°C, Max Power Dissipation=110W, Min Operating Temperature=-55°C, Supplier Part Number=942-IRFR5305TRLPBF, Threshold Voltage=-4V, ComponentLink1Description=http://www.farnell.com/datasheets/274342.pdf?src-supplier=Element14, ComponentLink1URL=http://www.farnell.com/datasheets/274342.pdf?src-supplier=Element14, ComponentLink2Description=http://www.farnell.com/datasheets/139980.pdf?src-supplier=Element14, ComponentLink2URL=http://www.farnell.com/datasheets/139980.pdf?src-supplier=Element14, Drain to Source Voltage (Vdss)=-55V, Halogen Free="Halogen Free", Height=0.094inch, Item Type=MOSFET, Lead Free="Contains Lead", Length=0.409inch, Manufacturer Part Number=IRFR5305TRLPBF, Max Dual Supply Voltage=-55V, Mounting Technology="Surface Mount", Packaging="Cut Tape", Pins=3, Polarization=P, Power Dissipation=110W, Pricing="1=1.28, 10=1.04, 50=1.04, 100=0.821, 1000=0.54, 10000=0.49 (USD)", Rds On Max=65mR, Reach SVHC Compliant=No, RoHS=Yes, RoHS Compliant=Yes, Series=HEXFET®, Stock=19036, Supplier=Mouser, Turn-Off Delay Time=39ns, Turn-On Delay Time=14ns, Width=0.265inch
R1 R14 R23: library part RC0402DR-0727KL, "RES 27K OHM 0.5% 1/16W 0402", Case/Package=0402, LCSC Part Number=C138076, Manufacturer=Yageo, Max Operating Temperature=155°C, Max Power Dissipation=63mW, Min Operating Temperature=-55°C, Resistance=27kR, Resistor Type="Thick Film", Supplier Part Number 1=603-RC0402DR-0727KL, Temperature Coefficient=100ppm/°C, Tolerance=0.5%, Category="Chip SMD Resistors", ComponentLink1Description=http://www.yageo.com.tw/exep/pages/download/literatures/PYu-R_INT-thick_7.pdf?src-supplier=Digi-Key, ComponentLink1URL=http://www.yageo.com.tw/exep/pages/download/literatures/PYu-R_INT-thick_7.pdf?src-supplier=Digi-Key, Features="Moisture Resistant", Height=0.016inch, Length=0.039inch, Manufacturer Part Number=RC0402DR-0727KL, Number of Terminations=2, Packaging="Tape and Reel", Pricing 1="1=0.13000, 10=0.07000, 50=0.07000, 100=0.02900, 1000=0.01300, 10000=0.00700 (USD)", RoHS=Yes, RoHS Compliant=Yes, Supplier 1=Mouser, Width=0.02inch
R2: library part RC0402FR-074K7L, "RES 4.7K OHM 1% 1/16W 0402", Case Code (Imperial)=0402, Case Code (Metric)=1005, LCSC Part Number=C105871, Manufacturer=Yageo, Max Operating Temperature=155°C, Max Power Dissipation=63mW, Min Operating Temperature=-55°C, Power Rating=62.5mW, Resistance=4.7kR, Resistance Tolerance=1%, Resistor Type="Thick Film", Temperature Coefficient=100ppm/°C, Voltage Rating=50V, Case/Package=0402, Category="Chip SMD Resistors", ComponentLink1Description=https://datasheet.ciiva.com/22661/1686128-22661342.pdf?src-supplier=Element14, ComponentLink1URL=https://datasheet.ciiva.com/22661/1686128-22661342.pdf?src-supplier=Element14, ComponentLink2Description=https://datasheet.ciiva.com/7850/1018594-7850022.pdf?src-supplier=Element14, ComponentLink2URL=https://datasheet.ciiva.com/7850/1018594-7850022.pdf?src-supplier=Element14, ComponentLink3Description=https://datasheet.ciiva.com/7850/1018594-7850023.pdf?src-supplier=Element14, ComponentLink3URL=https://datasheet.ciiva.com/7850/1018594-7850023.pdf?src-supplier=Element14, ComponentLink4Description=https://datasheet.ciiva.com/15215/getdatasheetpartid-328119-15215035.pdf?src-supplier=Verical, ComponentLink4URL=https://datasheet.ciiva.com/15215/getdatasheetpartid-328119-15215035.pdf?src-supplier=Verical, Construction=Rectangular, Depth=0.5mm, Features="Moisture Resistant", Height=0.32mm, Height - Seated (Max)=0.016inch, Item Type=Resistor, Lead Free="Lead Free", Length=1mm, Manufacturer Part Number=RC0402FR-074K7L, Military Standard=Not, Number of Pins=2, Number of Terminations=2, Packaging="Tape and Reel", Pricing 1="10000=0.00085 (USD)", Reach SVHC Compliant=Yes, RoHS=Yes, RoHS Compliant=Yes, Series=RC, Size Code=0402, Stock 1=2420000, Supplier 1=Avnet, Supplier Part Number 1=RC0402FR-074K7L, Termination=SMD/SMT, Tolerance=1%, Voltage Rating (DC)=50V, Width=0.5mm
R3 R4: library part CRCW04021K00FKEDHP, "RES SMD 1K OHM 1% 1/5W 0402", Case Code (Imperial)=0402, Case Code (Metric)=1005, LCSC Part Number=C313354, Manufacturer="Vishay Dale", Max Operating Temperature=155°C, Max Power Dissipation=125mW, Min Operating Temperature=-55°C, Package Quantity=10, Resistance=1kR, Resistance Tolerance=1%, Resistor Type="Thick Film", Supplier Part Number 1=541-1.00KYCT-ND, Temperature Coefficient=100ppm/°C, Voltage Rating=50V, Case/Package=0402, ComponentLink1Description=http://www.farnell.com/datasheets/2339608.pdf?src-supplier=Element14, ComponentLink1URL=http://www.farnell.com/datasheets/2339608.pdf?src-supplier=Element14, ComponentLink2Description=http://www.vishay.com/docs/20043/crcwhpe3.pdf?src-supplier=Digi-Key, ComponentLink2URL=http://www.vishay.com/docs/20043/crcwhpe3.pdf?src-supplier=Digi-Key, ComponentLink3Description=http://www.mouser.com/ds/2/427/crcwhpe3-46056.pdf?src-supplier=Mouser, ComponentLink3URL=http://www.mouser.com/ds/2/427/crcwhpe3-46056.pdf?src-supplier=Mouser, ComponentLink4Description=http://www.vishay.com/docs/20043/crcwhpe3.pdf?src-supplier=Avnet, ComponentLink4URL=http://www.vishay.com/docs/20043/crcwhpe3.pdf?src-supplier=Avnet, ComponentLink5Description=http://www.vishay.com/docs/20043/crcwhpe3.pdf?src-supplier=Future+Electronics, ComponentLink5URL=http://www.vishay.com/docs/20043/crcwhpe3.pdf?src-supplier=Future+Electronics, Construction=Rectangular, Contact Plating=Tin, Depth=0.5mm, Features="Automotive AEC-Q200", Height=0.3mm, Lead Free="Lead Free", Length=1mm, Manufacturer Part Number=CRCW04021K00FKEDHP, Military Standard=Not, Mount="Surface Mount", Number of Pins=2, Number of Terminations=2, Packaging="Tape and Reel", Power Rating=125mW, Pricing 1="1=0.15, 10=0.132, 100=0.0506, 1000=0.02226, 2500=0.01923, 5000=0.0172 (USD)", Radiation Hardening=No, REACH SVHC=Unknown, RoHS Compliant=Yes, Series=CRCW-HP, Size Code=0402, Stock 1=315989, Supplier 1=Digi-Key, Technology="THICK FILM", Termination=SMD/SMT, Tolerance=1%, Voltage Rating (DC)=50V, Weight=2.3E-05oz, Width=0.5mm
R5 R6 R12 R13 R20: library part RC0402FR-0712KL, "RES 12K OHM 1% 1/16W 0402", Case Code (Imperial)=0402, Case Code (Metric)=1005, Manufacturer=Yageo, Max Operating Temperature=155°C, Max Power Dissipation=63mW, Min Operating Temperature=-55°C, Package Quantity=1, Power Rating=62.5mW, Resistance Tolerance=1%, Resistor Type="Thick Film", Supplier Part Number=5655139, Temperature Coefficient=100ppm/°C, Voltage Rating=50V, Case/Package=0402, Category="Chip SMD Resistors", ComponentLink1Description=https://datasheet.ciiva.com/46412/1018594-46412831.pdf?src-supplier=Element14, ComponentLink1URL=https://datasheet.ciiva.com/46412/1018594-46412831.pdf?src-supplier=Element14, ComponentLink2Description=https://datasheet.ciiva.com/2453/pyu-r-int-thick-7-2453380.pdf?src-supplier=Digikey, ComponentLink2URL=https://datasheet.ciiva.com/2453/pyu-r-int-thick-7-2453380.pdf?src-supplier=Digikey, ComponentLink3Description=https://datasheet.ciiva.com/2453/pyu-r-int-thick-7-2453381.pdf?src-supplier=Digikey, ComponentLink3URL=https://datasheet.ciiva.com/2453/pyu-r-int-thick-7-2453381.pdf?src-supplier=Digikey, ComponentLink4Description=https://datasheet.ciiva.com/2453/pyu-r-int-thick-7-2453379.pdf?src-supplier=Digikey, ComponentLink4URL=https://datasheet.ciiva.com/2453/pyu-r-int-thick-7-2453379.pdf?src-supplier=Digikey, ComponentLink5Description=https://datasheet.ciiva.com/12577/pyu-rc0402-51-rohs-l-6-r-12577269.pdf?src-supplier=Mouser, ComponentLink5URL=https://datasheet.ciiva.com/12577/pyu-rc0402-51-rohs-l-6-r-12577269.pdf?src-supplier=Mouser, ComponentLink6Description=https://datasheet.ciiva.com/7849/1018594-7849833.pdf?src-supplier=Element14, ComponentLink6URL=https://datasheet.ciiva.com/7849/1018594-7849833.pdf?src-supplier=Element14, ComponentLink7Description=https://datasheet.ciiva.com/7849/1018594-7849832.pdf?src-supplier=Element14, ComponentLink7URL=https://datasheet.ciiva.com/7849/1018594-7849832.pdf?src-supplier=Element14, ComponentLink8Description=https://datasheet.ciiva.com/16744/pyu-rc0402-51-rohs-l-6-r-16744492.pdf?src-supplier=Future+Electronics, ComponentLink8URL=https://datasheet.ciiva.com/16744/pyu-rc0402-51-rohs-l-6-r-16744492.pdf?src-supplier=Future+Electronics, Construction=Rectangular, Depth=0.5mm, Features="Moisture Resistant", Height=0.016inch, Lead Free=5697LeadFree, Length=1mm, Manufacturer Part Number=RC0402FR-0712KL, Military Standard=Not, Number of Terminations=2, Packaging="Tape and Reel", Pricing="10000=0.0011, 100000=0.0011, 300000=0.001, 750000=0.001, 2000000=0.0009 (USD)", Reach SVHC Compliant=No, RoHS=Yes, RoHS Compliant=Yes, Series=RC, Stock=2030000, Supplier="Future Electronics", Termination=SMD/SMT, Tolerance=1%, Voltage Rating (AC)=50V, Weight=2.3E-05oz, Width=0.02inch
R7 R9: library part RC0402FR-073K3L, "RES 3.3K OHM 1% 1/16W 0402", Case Code (Imperial)=0402, Case Code (Metric)=1005, LCSC Part Number=C137992, Manufacturer=Yageo, Max Operating Temperature=155°C, Max Power Dissipation=63mW, Min Operating Temperature=-55°C, Package Quantity=1, Power Rating=62.5mW, Resistance=3.3kR, Resistance Tolerance=1%, Resistor Type="Thick Film", Supplier Part Number 1=603-RC0402FR-073K3L, Temperature Coefficient=100ppm/°C, Voltage Rating=50V, Case/Package=0402, Category="Chip SMD Resistors", ComponentLink1Description=https://datasheet.ciiva.com/11808/0900766b80c66297-11808441.pdf?src-supplier=RSComponents, ComponentLink1URL=https://datasheet.ciiva.com/11808/0900766b80c66297-11808441.pdf?src-supplier=RSComponents, ComponentLink2Description=https://datasheet.ciiva.com/46394/1018594-46394940.pdf?src-supplier=Element14, ComponentLink2URL=https://datasheet.ciiva.com/46394/1018594-46394940.pdf?src-supplier=Element14, ComponentLink3Description=https://datasheet.ciiva.com/2453/pyu-r-int-thick-7-2453395.pdf?src-supplier=Digi-Key, ComponentLink3URL=https://datasheet.ciiva.com/2453/pyu-r-int-thick-7-2453395.pdf?src-supplier=Digi-Key, ComponentLink4Description=https://datasheet.ciiva.com/2453/pyu-r-int-thick-7-2453396.pdf?src-supplier=Digi-Key, ComponentLink4URL=https://datasheet.ciiva.com/2453/pyu-r-int-thick-7-2453396.pdf?src-supplier=Digi-Key, ComponentLink5Description=https://datasheet.ciiva.com/2453/pyu-r-int-thick-7-2453394.pdf?src-supplier=Digi-Key, ComponentLink5URL=https://datasheet.ciiva.com/2453/pyu-r-int-thick-7-2453394.pdf?src-supplier=Digi-Key, ComponentLink6Description=https://datasheet.ciiva.com/16746/pyu-rc0402-51-rohs-l-6-r-16746361.pdf?src-supplier=Future+Electronics, ComponentLink6URL=https://datasheet.ciiva.com/16746/pyu-rc0402-51-rohs-l-6-r-16746361.pdf?src-supplier=Future+Electronics, Construction=Rectangular, Depth=0.5mm, Features="Moisture Resistant", Height=0.016inch, Item Type=Resistor, Lead Free="Lead Free", Length=1mm, Manufacturer Part Number=RC0402FR-073K3L, Military Standard=Not, Number of Pins=2, Number of Terminations=2, Packaging="Tape and Reel", Pricing 1="1=0.10000, 10=0.01400, 50=0.01400, 100=0.00600, 1000=0.00300, 5000=0.00200, 10000=0.00100 (USD)", REACH SVHC="No SVHC", RoHS=Yes, RoHS Compliant=Yes, Series=RC, Size Code=0402, Stock 1=2413047, Supplier 1=Mouser, Technology="THICK FILM", Termination=SMD/SMT, Tolerance=1%, Voltage Rating (DC)=50V, Width=0.5mm
R8: library part RC0402FR-0733KL, "RES 33K OHM 1% 1/16W 0402", LCSC Part Number=C138003, Manufacturer=YAGEO, Package=0402, ComponentLink1Description=LCSC, ComponentLink1URL=https://www.lcsc.com/product-detail/Chip-Resistor-Surface-Mount_YAGEO-RC0402FR-0733KL_C138003.html, Item Type=Resistor, Manufacturer Part Number=RC0402FR-0733KL
R10 R16: library part RT0402BRD07100KL, "RES SMD 100K OHM 0.1% 1/16W 0402", LCSC Part Number=C852472, Manufacturer=Yageo, Supplier Part Number=YAG1343CT-ND, Voltage Rating (DC)=50V, Category="Chip SMD Resistors", ComponentLink1Description=https://datasheet.ciiva.com/12724/pyu-rt-1-to-0-05-rohs-l-4-12724954.pdf?src-supplier=Mouser, ComponentLink1URL=https://datasheet.ciiva.com/12724/pyu-rt-1-to-0-05-rohs-l-4-12724954.pdf?src-supplier=Mouser, Item Type=Resistor, Manufacturer Part Number=RT0402BRD07100KL, Pricing="1=0.16, 10=0.121, 50=0.0958, 100=0.0859, 500=0.0654, 1000=0.0578, 5000=0.04283 (USD)", RoHS=Yes, Stock=62932, Supplier=Digikey
R11: library part RL0603FR-070R3L, "RES 0.3 OHM 1% 1/10W 0603", Case/Package=0603, Manufacturer=Yageo, Max Operating Temperature=155°C, Max Power Dissipation=100mW, Min Operating Temperature=-55°C, Supplier Part Number=13-RL0603FR-070R3LCT-ND, Temperature Coefficient=800ppm/°C, Tolerance=1%, ComponentLink1Description=http://www.mouser.com/ds/2/447/PYu-RL_521_RoHS_L_5-2927.pdf?src-supplier=Mouser, ComponentLink1URL=http://www.mouser.com/ds/2/447/PYu-RL_521_RoHS_L_5-2927.pdf?src-supplier=Mouser, ComponentLink2Description=http://www.yageo.com/documents/recent/PYu-RL_Group_521_RoHS_L_2.pdf?src-supplier=Digikey, ComponentLink2URL=http://www.yageo.com/documents/recent/PYu-RL_Group_521_RoHS_L_2.pdf?src-supplier=Digikey, Features="Moisture Resistant", Height=0.022inch, Item Type=Resistor, Length=0.063inch, Manufacturer Part Number=RL0603FR-070R3L, Number of Terminations=2, Packaging="Tape and Reel", Pricing="1=0.24, 10=0.125, 50=0.0854, 100=0.0736, 500=0.054, 1000=0.04784 (USD)", RoHS=Yes, RoHS Compliant=Yes, Series=RL, Stock=13643, Supplier=Digikey, Width=0.031inch